# Altium PCB avr32da32_board_V2.PcbDoc
Units mil, origin at the board's own origin, x right, y up, seen from the top; angles counter-clockwise.
Board outline 1280 x 2865 mil, 2 copper layers (Top Layer, Bottom Layer); 34 components, 57 nets, 184 pads, 11 vias.
Unrouted connection lines stored in the file: 10.
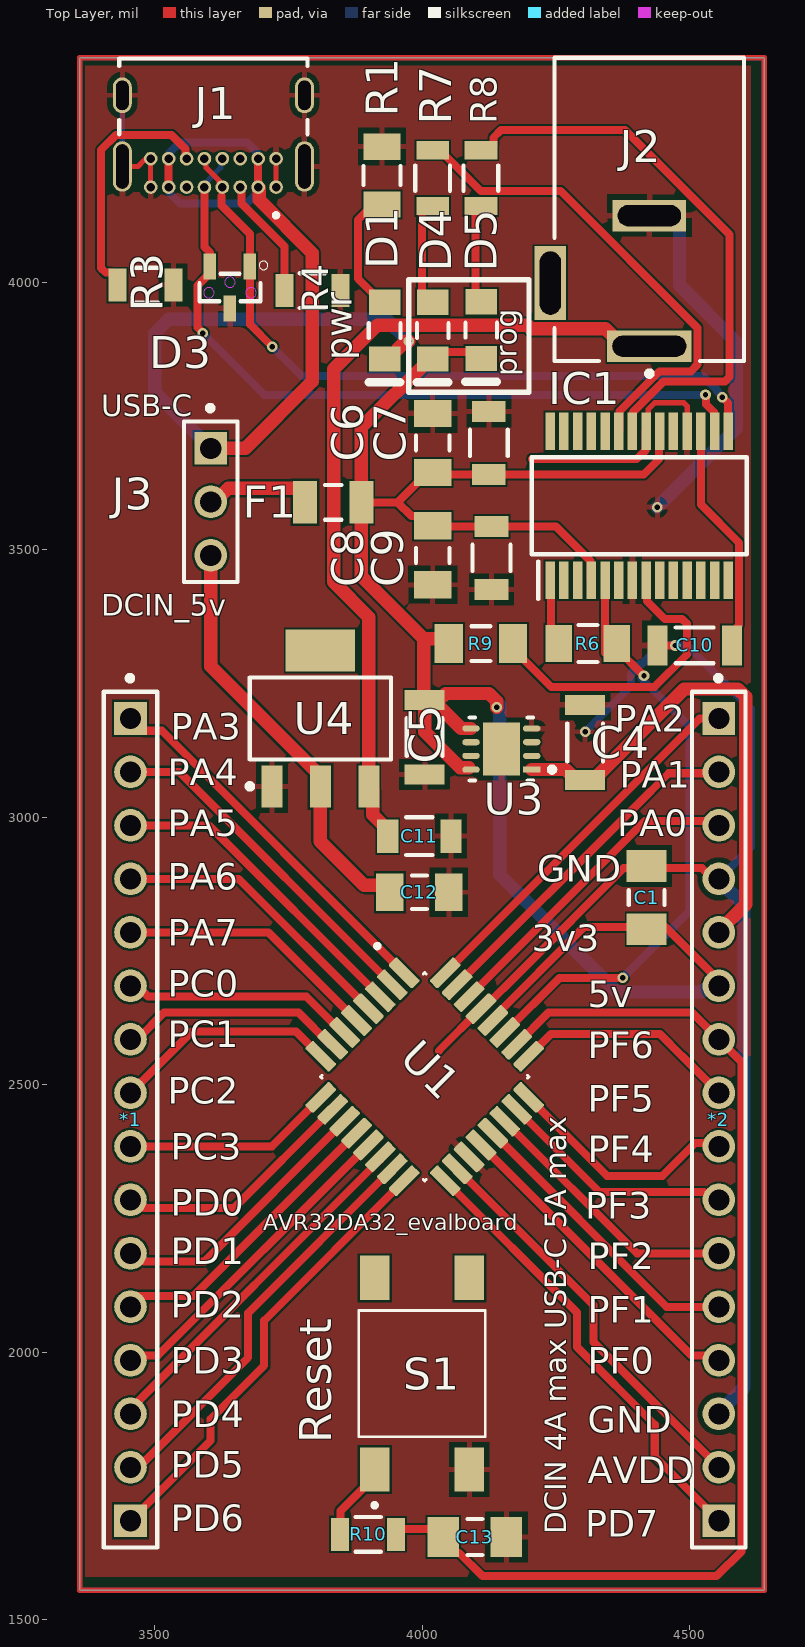
[diagram p0: Top Layer view]
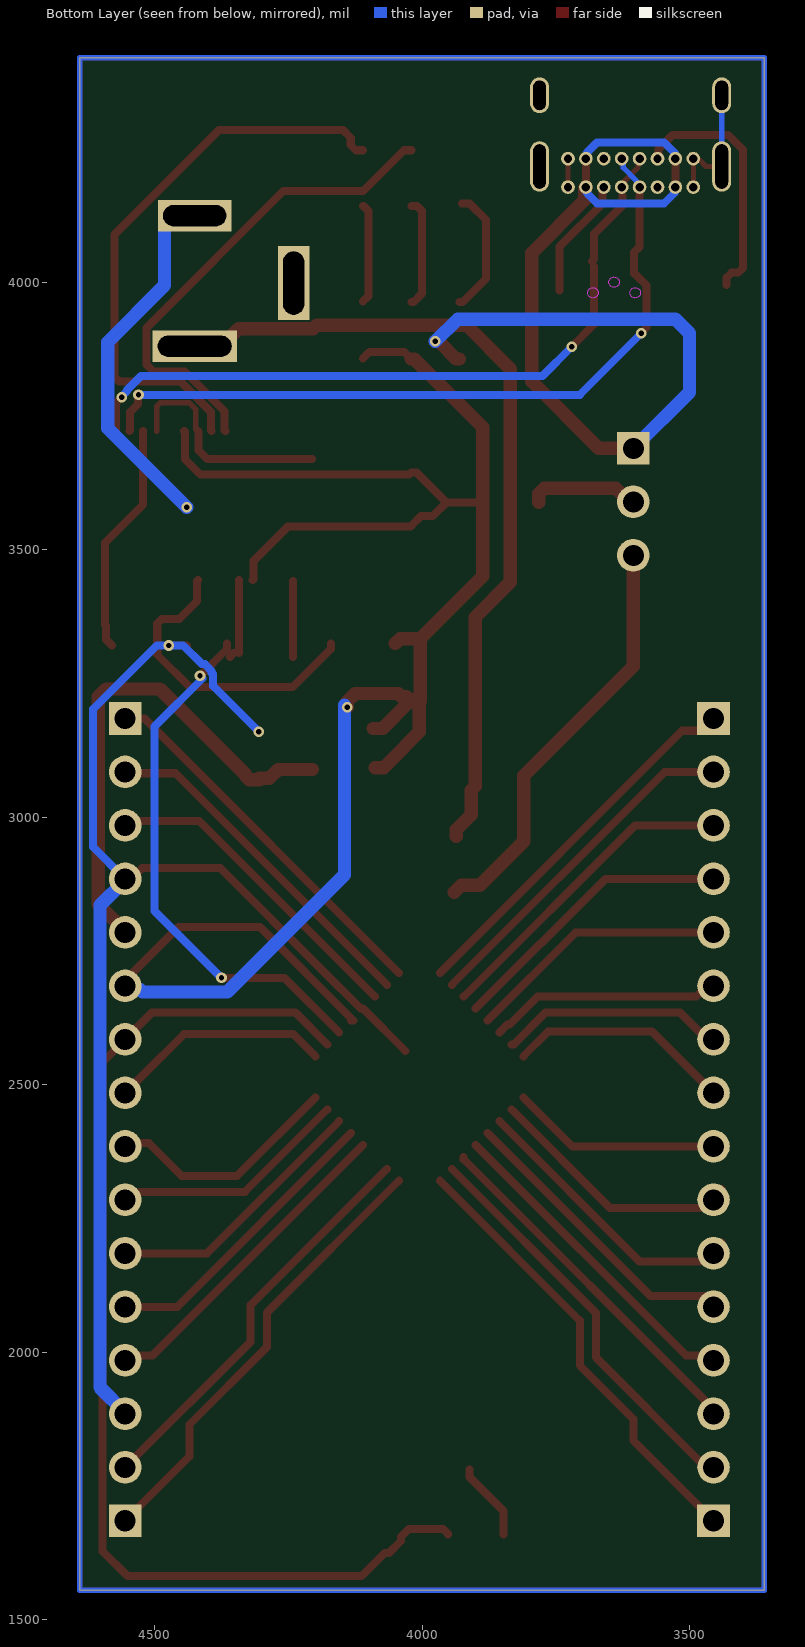
[diagram p1: Bottom Layer view, seen from below]

## Layer stack, top to bottom
Top Solder: solder mask 0.4, Solder Resist, Dk 3.5
Top Layer: signal copper 1.4
Dielectric 1: dielectric 12.6, FR-4, Dk 4.8
Bottom Layer: signal copper 1.4
Bottom Solder: solder mask 0.4, Solder Resist, Dk 3.5

## Board outline
3360,1555 3360,4420 4640,4420 4640,1555

## Design rules (kind name [scope] priority, off if disabled: settings)
Clearance [All] p1: gap=4 ignorepadtopadclearanceinfootprint=FALSE
PolygonConnect [All] p1: connectstyle=Relief reliefconductorwidth=10 reliefentries=4 polygonreliefangle="90 Angle" airgapwidth=10
RoutingVias [All] p1: holewidth=10 width=20 viastyle="Through Hole" minholewidth=10 minwidth=20 maxholewidth=10 maxwidth=20
SolderMaskExpansion [All] p1: expansion=4 istentingtop=FALSE
SupplyNets "Schematic Supply Nets_5" [InNet('VIN')] p1: voltage=0.000
SupplyNets "Schematic Supply Nets_4" [InNet('VBUS')] p2: voltage=0.000
SupplyNets "Schematic Supply Nets_3" [InNet('VCC')] p3: voltage=0.000
SupplyNets "Schematic Supply Nets_2" [InNet('+3v3')] p4: voltage=0.000
SupplyNets "Schematic Supply Nets_1" [InNet('GND')] p5: voltage=0.000
SupplyNets "Schematic Supply Nets" [InNet('+5')] p6: voltage=0.000
Width [All] p1: maxlimit=25 minlimit=10 preferedwidth=15
30 further rules are at their usual default settings.

## Components (designator, comment, footprint, x,y, rotation, side; value= is the part's Value field where it differs from the comment)
*1 "Custom Connector_16" "Custom Connector_16" 3455,2485 r270 top
*2 "Custom Connector_16" "Custom Connector_16" 4555,2485 r270 top
C1 "Capacitor 10 uF +/- 10% 16 V 1206" CAPC3216X180X50ML20T25 4420,2850 r270 top value=100nF
C4 "Capacitor 1 uF +/- 10% 25 V 1206" CAPC3216X180X20ML20 4305,3140.12 r270 top value=1µF
C5 "Capacitor 1 uF +/- 10% 25 V 1206" CAPC3216X180X20ML20 4005,3150 r90 top value=1µF
C6 "Capacitor 10 uF +/- 10% 16 V 1206" CAPC3216X180X50NL20T25 4020,3700 r90 top value=10µF
C7 "100nF" FP-1206-L_3_2_0_2-W_1_6_0-MFG 4125,3700 r90 top
C8 "Capacitor 10 uF +/- 10% 16 V 1206" CAPC3216X180X50NL20T25 4020,3490 r270 top value=10µF
C9 "100nF" FP-1206-L_3_2_0_2-W_1_6_0-MFG 4130,3485 r270 top
C10 "Capacitor 1 uF +/- 10% 25 V 1206" CAPC3216X180X20ML20 4509.73,3321.44 r180 top value=1µF
C11 "100nF" FP-1206-L_3_2_0_2-W_1_6_0-MFG 3995,2965 r0 top
C12 "Capacitor 10 uF +/- 10% 16 V 1206" CAPC3216X180X50NL20T25 3995.12,2860 r0 top value=10µF
C13 "Capacitor 10 uF +/- 10% 16 V 1206" CAPC3216X180X50ML20T25 4098.69,1654.66 r0 top
D1 "POWER_LED" LUMX-SML-LX1206IC_V 3930,3910 r270 top
D3 "CDSOT23-SM712" SOT95P230X117-3N 3640.82,3990.64 r270 top
D4 "SMLLX1206ICTR" LUMX-SML-LX1206IC_V 4020,3910 r270 top
D5 "SMLLX1206ICTR" LUMX-SML-LX1206IC_V 4110.68,3911.06 r270 top
F1 "0466001.NR" FP-0466-MFG 3833.98,3588.98 r0 top
IC1 "CY7C65213-28PVXI" SOP65P780X200-28N 4406.12,3582.69 r90 top
J1 "USB4085-GF-A_REVB" GCT_USB4085-GF-A_REVB 3610,4350 r180 top
J2 "PJ-002A" CUI-PJ-002A_V 4425,3999.02 r90 top
J3 "90120-0763" FP-90120-0763-MFG 3605,3590 r270 top
R1 "MCA1206MD1001BP100" FP-MCA1206-IPC_B 3925,4200 r270 top value=1k
R3 "CR1206-JW-151ELF" FP-CR1206-IPC_C 3482.76,3995 r0 top value=5.1k
R4 "CR1206-JW-151ELF" FP-CR1206-IPC_C 3795,3984.71 r0 top value=5.1k
R6 "MCA1206MD1001BP100" FP-MCA1206-IPC_B 4310,3325 r0 top value=1k
R7 "CR1206-JW-151ELF" FP-CR1206-IPC_C 4020,4195 r270 top value=150
R8 "CR1206-JW-151ELF" FP-CR1206-IPC_C 4110,4195 r270 top value=150
R9 "Resistor 10k +/-1% 1206 250 mW" RESC3216X60X45ML15T20 4110,3325 r180 top value=10k
R10 "CR1206-JW-151ELF" FP-CR1206-IPC_C 3899.25,1659.65 r180 top value=150
S1 "TS04-66-43-BK-100-SMT" SW_TS04-66-43-BK-100-SMT 4000,1960 r90 top
U1 "AVR32DA32-I/PT" QFP80P900X900X120-32N 4005,2515 r315 top
U3 "NCV8165ML330TCG" FP-507AD-IPC_B 4148.29,3127.8 r180 top
U4 "LD1117S50TR" STM-SOT-223_M 3810,3185 r90 top

## Footprints (in the part's own frame and the unit in brackets; to place one, negate y for a bottom-side part, rotate by r counter-clockwise, add the part's x,y. Pads: shape width x height; smd on the part's side, far side on the other; paste and mask are expansions set on the pad)
CAPC3216X180X20ML20 [mm] "Chip Capacitor, 2-Leads, Body 3.40x1.80mm, IPC Low Density"
  rect 0.95x1.9 smd: 1(-1.775,0) 2(1.775,0)
  silkscreen extent -0.9,-0.85 0.9,0.85, body extent -1.7,-0.9 1.7,0.9, height 1.8
CAPC3216X180X50ML20T25 [mm] "Chip Capacitor, 2-Leads, Body 3.40x1.80mm, IPC Low Density"
  rect 1.5x1.9 smd: 1(-1.5,0) 2(1.5,0)
  silkscreen extent -0.35,-0.85 0.35,0.85, body extent -1.7,-0.9 1.7,0.9, height 1.8
CAPC3216X180X50NL20T25 [mm] "Chip Capacitor, 2-Leads, Body 3.40x1.80mm, IPC Medium Density"
  rect 1.3x1.8 smd: 1(-1.4,0) 2(1.4,0)
  silkscreen extent -0.35,-0.8 0.35,0.8, body extent -1.7,-0.9 1.7,0.9, height 1.8
CUI-PJ-002A_V [mm] "THD, 3-Leads, Body 14.4x9mm, Height 11mm"
  rect 1.5x4 hole 1 slot 3.5 at 90 deg: 1(-3,0)
  rect 1.5x3.5 hole 1 slot 3 at 90 deg: 2(3.2,0)
  rect 3.5x1.5 hole 1 slot 3 at 0 deg: 3(0,4.7)
  silkscreen extent -4.42,-4.5 10.7,4.5, body extent -3.7,-4.5 10.7,4.9, height 11
"Custom Connector_16" [mm]
  rect 1.55x1.55 hole 1 paste-2539.97 mask+0: 1(-17.78,0) 16(20.32,0)
  round 1.55 hole 1 paste-2539.97 mask+0: 2(-15.24,0) 3(-12.7,0) 5(-7.62,0) 6(-5.08,0) 7(-2.54,0) 8(0,0) 9(2.54,0) 11(7.62,0) 12(10.16,0) 13(12.7,0) 14(15.24,0) 15(17.78,0)
  round 1.55 hole 1 paste-2539.97 mask-2539.97: 4(-10.16,0) 10(5.08,0)
  silkscreen extent -19.81,-1.27 21.59,1.27, body extent -19.15,-1.37 19.15,1.37, height 0.25
FP-0466-MFG [mil]
  rect 45x80 smd paste+0 mask+0: 1(-52.5,0) 2(52.5,0)
  silkscreen extent -15,-32 15,32, body extent -79,-44 79,44, height 10
FP-507AD-IPC_B [mm]
  rect 0.831x0.292 smd paste+0 mask+0: 1(-1.441,0.975)
  rrect100% 0.831x0.292 smd paste+0 mask+0: 2(-1.441,0.325) 3(-1.441,-0.325) 4(-1.441,-0.975) 5(1.441,-0.975) 6(1.441,-0.325) 7(1.441,0.325) 8(1.441,0.975)
  rect 1.75x2.5 smd paste-1000 mask+0: 9(0,0)
  silkscreen extent -2.53,-1.5 1.5,1.5, body extent -2.11,-1.75 2.11,1.75, height 0.25
FP-1206-L_3_2_0_2-W_1_6_0-MFG [mm]
  rect 1x1.6 smd paste+0 mask+0: 1(-1.5,0) 2(1.5,0)
  silkscreen extent -0.63,-0.9 0.63,0.9, body extent -2.1,-1 2.1,1, height 0.25
FP-90120-0763-MFG [mm]
  rect 1.55x1.55 hole 1 paste-2539.97 mask+0: 1(-2.54,0)
  round 1.55 hole 1 paste-2539.97 mask+0: 2(0,0) 3(2.54,0)
  silkscreen extent -4.57,-1.27 3.81,1.27, body extent -3.91,-1.37 3.91,1.37, height 0.25
FP-CR1206-IPC_C [mil]
  rect 33.79x61.5 smd paste+0 mask+0: 1(-52.24,0) 2(52.24,0)
  silkscreen extent -24,-32 24,32, body extent -73,-36 73,36, height 10
FP-MCA1206-IPC_B [mil]
  rect 49.44x69.22 smd paste+0 mask+0: 1(-54.18,0) 2(54.18,0)
  silkscreen extent -18,-35 18,35, body extent -89,-44 89,44, height 10
GCT_USB4085-GF-A_REVB [mm]
  round 0.65 hole 0.4: A1(-2.975,4.36) A4(-2.125,4.36) A5(-1.275,4.36) A6(-0.425,4.36) A7(0.425,4.36) A8(1.275,4.36) A9(2.125,4.36) A12(2.975,4.36) B1(2.975,3.01) B4(2.125,3.01) B5(1.275,3.01) B6(0.425,3.01) B7(-0.425,3.01) B8(-1.275,3.01) B9(-2.125,3.01) B12(-2.975,3.01)
  oval 0.9x1.7 hole 0.6 slot 1.4 at 90 deg: S1(-4.325,0) S2(4.325,0)
  oval 0.9x2.4 hole 0.6 slot 2.1 at 90 deg: S3(-4.325,3.38) S4(4.325,3.38)
  silkscreen extent -4.47,-1.74 4.47,5.8, body extent -4.47,-4.25 4.47,4.92, height 3.46
LUMX-SML-LX1206IC_V [mm] "SMD, 2-Leads, Body 3.2x1.5mm"
  rect 1.2x1.5 smd: 1(-1.35,0) 2(1.35,0)
  silkscreen extent -0.35,-0.75 2.45,0.75, body extent -1.6,-0.8 1.6,0.8, height 1.1
QFP80P900X900X120-32N [mm]
  rrect25% 1.6x0.55 smd: 1(-4.18,2.8) 2(-4.18,2) 3(-4.18,1.2) 4(-4.18,0.4) 5(-4.18,-0.4) 6(-4.18,-1.2) 7(-4.18,-2) 8(-4.18,-2.8) 17(4.18,-2.8) 18(4.18,-2) 19(4.18,-1.2) 20(4.18,-0.4) 21(4.18,0.4) 22(4.18,1.2) 23(4.18,2) 24(4.18,2.8)
  rrect25% 0.55x1.6 smd: 9(-2.8,-4.18) 10(-2,-4.18) 11(-1.2,-4.18) 12(-0.4,-4.18) 13(0.4,-4.18) 14(1.2,-4.18) 15(2,-4.18) 16(2.8,-4.18) 25(2.8,4.18) 26(2,4.18) 27(1.2,4.18) 28(0.4,4.18) 29(-0.4,4.18) 30(-1.2,4.18) 31(-2,4.18) 32(-2.8,4.18)
  silkscreen extent -6.08,-3.5 3.5,3.5, body extent -4.5,-4.5 4.5,4.5, height 1.2
RESC3216X60X45ML15T20 [mm] "Chip Resistor, 2-Leads, Body 3.3x1.75mm, IPC Low Density"
  rect 1.35x1.85 smd: 1(-1.525,0) 2(1.525,0)
  silkscreen extent -0.45,-0.82 0.45,0.82, body extent -1.65,-0.87 1.65,0.87, height 0.6
SOP65P780X200-28N [mm]
  rect 1.775x0.45 smd: 1(-3.538,4.225) 2(-3.538,3.575) 3(-3.538,2.925) 4(-3.538,2.275) 5(-3.538,1.625) 6(-3.538,0.975) 7(-3.538,0.325) 8(-3.538,-0.325) 9(-3.538,-0.975) 10(-3.538,-1.625) 11(-3.538,-2.275) 12(-3.538,-2.925) 13(-3.538,-3.575) 14(-3.538,-4.225) 15(3.538,-4.225) 16(3.538,-3.575) 17(3.538,-2.925) 18(3.538,-2.275) 19(3.538,-1.625) 20(3.538,-0.975) 21(3.538,-0.325) 22(3.538,0.325) 23(3.538,0.975) 24(3.538,1.625) 25(3.538,2.275) 26(3.538,2.925) 27(3.538,3.575) 28(3.538,4.225)
  silkscreen extent -4.43,-5.1 2.3,5.1, body extent -3.9,-5.1 3.9,5.1, height 2
SOT95P230X117-3N [mm]
  rect 1.25x0.6 smd paste-2: 1(-1,0.95) 2(-1,-0.95) 3(1,0)
  Keep-Out Layer circle w0: c0.25,1 r0.25
  Keep-Out Layer circle w0: c0.25,-1 r0.25
  Keep-Out Layer circle w0: c-0.25,0 r0.25
  silkscreen extent -1.26,-1.45 0.65,1.81, body extent -1.15,-1.45 1.15,1.45, height 1.17
STM-SOT-223_M [mm] "SOT223, 4-Leads, Body 6.7x3.7mm, Pitch 2.3mm, IPC Low Density"
  rect 2x1 smd: 1(-3.225,2.3) 2(-3.225,0) 3(-3.225,-2.3)
  rect 2x3.3 smd: 4(3.225,0)
  silkscreen extent -3.35,-3.35 1.95,3.47, body extent -3.5,-3.35 3.5,3.35, height 1.8
SW_TS04-66-43-BK-100-SMT [mm]
  rect 2.1x1.4 smd: 1(-4.55,2.25) 2(-4.55,-2.25) 3(4.55,2.25) 4(4.55,-2.25)
  silkscreen extent -6.35,-3 3,3, body extent -5,-3 5,3, height 4.3

## Part data
C1 C6 C8 C12: library part CMP-001-00016-6, "Chip Capacitor, 10 uF, +/- 10%, 16 V, 1206 (3216 Metric)", Capacitor Type=Ceramic, Case/Package=1206, Max Operating Temperature=125°C, Min Operating Temperature=-55°C, Tolerance=10%, Voltage Rating=16V, Mounting Technology=SM, Pins=2, RoHS Compliant=True
C4 C5 C10: library part CMP-001-00006-6, "Chip Capacitor, 1 uF, +/- 10%, 25 V, 1206 (3216 Metric)", Capacitor Type=Ceramic, Case/Package=1206, Max Operating Temperature=125°C, Min Operating Temperature=-55°C, Tolerance=10%, Voltage Rating=25V, Mounting Technology=SM, Pins=2, RoHS Compliant=True
C7 C9 C11: library part CMP-2000-05018-2, "General Purpose Ceramic Capacitor, 1206, 100nF, 10%, X7R, 15%, 50V", Case Code (Imperial)=1206, Case Code (Metric)=3216, Dielectric=X7R, Dielectric Material=Ceramic, Insulation Resistance=100GR, Max Operating Temperature=125°C, Min Operating Temperature=-55°C, Package Quantity=1, Tolerance=10%, Voltage=50V, Capacitance=100nF, Case/Package=1206, Construction=Flat, Contact Plating=Tin, Depth=1.6mm, Dissipation Factor=2.5%, Height=0.94mm, Lead Free="Lead Free", Length=3.2mm, Mount="Surface Mount", Number of Pins=2, Packaging="Tape and Reel", Radiation Hardening=No, REACH SVHC="No SVHC", RoHS Compliant=Yes, Series=-, Termination=SMD/SMT, Thickness=0.037inch, Voltage Rating=50V, Voltage Rating (DC)=50V, Width=1.6mm
C13: library part CMP-2000-05018-2, "General Purpose Ceramic Capacitor, 1206, 100nF, 10%, X7R, 15%, 50V", Capacitance=100nF, Case Code (Imperial)=1206, Case Code (Metric)=3216, Dielectric=X7R, Dielectric Material=Ceramic, Insulation Resistance=100GR, Max Operating Temperature=125°C, Min Operating Temperature=-55°C, Package Quantity=1, Tolerance=10%, Voltage=50V, Case/Package=1206, Construction=Flat, Contact Plating=Tin, Depth=1.6mm, Dissipation Factor=2.5%, Height=0.94mm, Lead Free="Lead Free", Length=3.2mm, Mount="Surface Mount", Number of Pins=2, Packaging="Tape and Reel", Radiation Hardening=No, REACH SVHC="No SVHC", RoHS Compliant=Yes, Series=-, Termination=SMD/SMT, Thickness=0.037inch, Voltage Rating=50V, Voltage Rating (DC)=50V, Width=1.6mm
D1 D4 D5: library part CMP-007-00044-1, "LED Uni-Color Red 635nm 2-Pin T/R"
D3: library part CMP-004-00031-2, "CDSOT23-SM712 Dual Bi-Directional TVS Diode 400W 3-Pin SOT-23", Case/Package="SOT-23 Bourns", Check_prices=https://www.snapeda.com/parts/CDSOT23-SM712/Bourns/view-part/?ref=eda, Component Type=Standard, Design Item ID=CDSOT23-SM712, MF=Bourns, MP=CDSOT23-SM712, Pins=3, SnapEDA_Link=https://www.snapeda.com/parts/CDSOT23-SM712/Bourns/view-part/?ref=snap, Source=CDSOT23-SM712.SchLib
F1: library part CMP-005-00014-1, "Electric Fuse, Very Fast Blow, 1A, 63VAC, 63VDC, 50A (IR), Surface Mount, 1206", Current Rating=1A, Max Operating Temperature=90°C, Min Operating Temperature=-55°C, Mounting Technology="Surface Mount", RoHS Compliant=Yes
IC1: "Integrated Circuit", Manufacturer_Name=Infineon, Mouser Part Number=727-CY7C65213-28PVXI, Arrow Part Number=CY7C65213-28PVXI, Arrow Price/Stock=https://www.arrow.com/en/products/cy7c65213-28pvxi/cypress-semiconductor?region=nac, Datasheet Link=http://www.mouser.com/datasheet/2/100/001-81011_CY7C65213_USB-UART_LP_Bridge_Controller_-348826.pdf, Height=2mm, Manufacturer_Part_Number=CY7C65213-28PVXI, Mouser Price/Stock=https://www.mouser.co.uk/ProductDetail/Infineon-Technologies/CY7C65213-28PVXI?qs=dOK1vf2izjvExqwVZ7qYig%3D%3D
J1: library part CMP-012-000000-1, "USB-C (USB TYPE-C) USB 2.0 æ’åº§è¿žæŽ¥å™¨ 24 (16+8 Dummy) ä½é€šå­”ã€ç›´è§’ã€ä½Žæˆæœ¬ã€3.46mm å¤–å½¢ã€16 é’ˆã€æ°´å¹³ã€é¡¶éƒ¨å®‰è£…", Package=None, Check_prices=https://www.snapeda.com/parts/USB4085-GF-A/Global+Connector+Technology/view-part/?ref=eda, Component Type=Standard, Design Item ID=USB4085-GF-A_REVB, MF="Global Connector Technology", MP=USB4085-GF-A, Pin Count=20, SnapEDA_Link=https://www.snapeda.com/parts/USB4085-GF-A/Global+Connector+Technology/view-part/?ref=snap, Source=USB4085-GF-A_REVB.SchLib
J2: library part CMP-002-00078-1, "12V, 1A, 2mm Dia", Voltage Rating=12V, Connector Type=Circular,Power, Mounting Technology=Board, RoHS Compliant=Yes
J3: library part CMP-002-00075-2, "Board Connector, 3 Contact(s), 1 Row(s), Male, Straight, 0.1 inch Pitch, Solder Terminal, Black Insulator, Receptacle", Max Operating Temperature=125°C, Min Operating Temperature=-55°C, Connector Type="BOARD CONNECTOR", Mounting Technology=Board, RoHS Compliant=Yes
R1 R6: library part CMP-009-00186-1, "Fixed Resistor, Thin Film, 0.25W, 1000ohm, 200V, 0.1% +/-Tol, 25ppm/Cel, Surface Mount, 1206", Case/Package=1206, Max Operating Temperature=155°C, Min Operating Temperature=-55°C, Power=400mW, Tolerance=0.1%, Pins=2, RoHS Compliant=Yes
R3 R4 R7 R8 R10: library part CMP-009-00182-1, "Fixed Resistor, Metal Glaze/thick Film, 0.25W, 150ohm, 200V, 5% +/-Tol, 200ppm/Cel, Surface Mount, 1206", Case/Package=1206, Max Operating Temperature=155°C, Min Operating Temperature=-55°C, Power=250mW, Tolerance=5%, Mounting Technology="Surface Mount", Pins=2, RoHS Compliant=Yes
R9: library part CMP-009-00016-5, "Chip Resistor, 10 KOhm, +/- 1%, 0.25 W, -55 to 155 degC, 1206 (3216 Metric)", Case/Package=1206, Max Operating Temperature=155°C, Min Operating Temperature=-55°C, Power=250mW, Tolerance=1%, Voltage Rating=200V, Mounting Technology=SM, Pins=2, RoHS Compliant=True
S1: library part CMP-014-000000-2, "Tactile Switches 6 x 6 mm, 4.3 mm Act Height, 100 gf, Black, Surface Mount, SPST,", Package=None, Availability=Unavailable, Component Type=Standard, Design Item ID=TS04-66-43-BK-100-SMT, MP=TS04-66-43-BK-100-SMT, Pin Count=4, Price=None, Source=TS04-66-43-BK-100-SMT.SchLib
U1: library part CMP-031-00006-3, "RISC Microcontroller, 8-Bit, FLASH, AVR CPU, 24MHz, CMOS, PQFP32", Case/Package=TQFP32, Max Supply Voltage=5.5V, Mfr_Name=Microchip, Min Supply Voltage=1.8V, ComponentLink1Description=https://www.digikey.ro/ro/products/detail/microchip-technology/AVR32DA32-I-PT/12396890, Design Item ID=AVR32DA32-IPT, Mounting Technology=SMD, RefDes=RefDes, RoHS Compliant=Yes, Source=AVR32DA32-IPT.SchLib, Type=Type
U3: library part CMP-012-00001-1, "Fixed Positive LDO Regulator, 3.3V, 0.29V Dropout, PDSO8"
U4: library part CMP-019-00006-3, "Fixed Low Drop Positive Voltage Regulator, 5 V, 0 to 125 degC, 4-Pin SOT223, RoHS, Tape and Reel", Case/Package=TO-261-4, Dropout Voltage=1.1V, Manufacturer=STMicroelectronics, Max Input Voltage=15V, Max Operating Temperature=125°C, Max Ouput Current=1.3A, Min Input Voltage=6.5V, Min Operating Temperature=0°C, Nominal Output Voltage=5V, Output Current=950mA, Package Description="4-Pin Small Outline Transistor, Body 6.5 x 3.5 mm, Pitch 2.3 mm", Package Quantity=2500, Package Reference=SOT-223, Power=12W, Datasheet URL=http://www.st.com/content/ccc/resource/technical/document/datasheet/99/3b/7d/91/91/51/4b/be/CD00000544.pdf/files/CD00000544.pdf/jcr:content/translations/en.CD00000544.pdf, Datasheet Version=Nov-13, Manufacturer URL=http://www.st.com/, Max Supply Voltage=15V, Min Supply Voltage=6.5V, Mounting Technology=SM, Output Voltage=5V, Outputs=1, Packaging=TapeandReel, Pins=4, RoHS Compliant=True

## Via types
v1: diameter 20, hole 10, Top Layer to Bottom Layer, 11 vias

## Nets (pads, with @x,y where several pads share a name; then routed paths per layer and width w, separated by ;. In a path a pad name is that pad's centre, name@x,y a point inside that pad or via, vN(x,y) a via of type N, cw(c..) or ccw(c..) an arc to the next point about the centre after c; other vN are vias at no path point)
+3v3: *2.5 C4.2 U3.1 | length 945.6
  Top Layer w25: U3.1 4269.17,3089.41 4285.56,3073.03 C4.2@4304.26,3073.03 ; C4.2@4304.26,3070.48 4322.96,3070.48 4329.16,3076.68 4329.16,3079.23 4489.93,3240 4590.36,3240 4605,3225.36 4605,2837.16 4555,2787.16 *2.5
+5: C12.1 J3.3 U4.2 | length 789.5
  Top Layer w25: J3.3 3605,3282.72 3810,3077.72 U4.2 3810,2955 3891.55,2873.45 3926.91,2873.45 3940,2860.36 C12.1
GND: *2.4 *2.14 C1.1 C4.1 C5.1 C6.2 C7.2 C8.2 C9.2 C10.2 C11.2 C12.2 C13.2 D3.3 IC1.7 IC1.18 IC1.21 J1.A1 J1.A12 J1.B1 J1.B12 J1.S1 J1.S2 J1.S3 J1.S4 J2.2 R1.1 R3.2 R4.2 S1.2 U1.19 U1.29 U3.4 U3.9 U4.1 | length 3387.1
  Top Layer w10: J1.S4 3469.04,4216.93 3480.63,4228.51 3489.89,4228.51 J1.B1@3492.46,4231.08 ; J1.A12@3492.46,4178.76 J1.B1@3492.46,4231.08 ; J1.B1 J1.B1@3492.46,4231.08 ; J1.A1 J1.B12 ; IC1.21 4422.77,3725.83 4422.77,3762.77 4435,3775 4489.83,3775 4495.69,3769.14 IC1.18
  Top Layer w15: 4031.36,2563.64 U1.29 ; 4205.33,3670 4401.41,3670 4417.56,3686.15 4417.56,3720.62 IC1.21 ; C10.2 v1(4473.5,3321.44)
  Bottom Layer w10: J1.S4 J1.S2
  Bottom Layer w15: v1(4305,3160) 4391,3246 4391,3267.87 4393.5,3270.37 4393.5,3273.91 4406.09,3286.5 4411.5,3286.5 4446.44,3321.44 v1(4473.5,3321.44) 4495.85,3321.44 4615,3202.29 4615,2945 *2.4
  Bottom Layer w25: J2.2 4464.37,4125 4481.4,4107.97 4481.4,3994.53 4587.78,3888.15 4587.78,3727.78 v1(4440,3580) ; *2.14 4555,1887.16 4602.01,1934.17 4602.01,2835.83 4555,2882.84 *2.4
GPIO5: IC1.8 R9.1 | length 579.3
  Top Layer w15: R9.1 4170.04,3315.16 4241.7,3243.5 4434.28,3243.5 4495,3304.22 4495,3362.39 4486.21,3371.18 4453.82,3371.18 4420.27,3404.73 4420.27,3442.04 IC1.8
Net*2_7: *2.7 C13.1 R10.1 U1.26 | length 1685.5
  Top Layer w15: R10.1 3951.5,1660.61 3960.89,1670 4024.29,1670 C13.1 4039.63,1646.79 4061.66,1624.76 4069.53,1624.76 4112.79,1581.5 4550.78,1581.5 4597.01,1627.74 4597.01,2314.18 4597.01,2542.99 *2.7
Net*2_15: *2.15 U1.18 | length 760.6
  Top Layer w15: U1.18 4320.68,2087.96 4320.68,2019.32 *2.15
NetC10_1: C10.1 IC1.17 | length 435.6
  Top Layer w15: IC1.17 4521.28,3584.88 4592.82,3513.34 4592.82,3360.13 4590.82,3358.13 4590.82,3332.64 C10.1
NetD1_1: D1.1 R1.2 | length 235.5
  Top Layer w15: R1.2@3925,4147.76 3911.14,4147.76 3880,4116.61 3880,4007.24 3924.09,3963.15 D1.1
NetD2_1: 
NetD3_1: D3.1 IC1.15 J1.A6 J1.B6 | length 1267.3
  Top Layer w15: 3625,4161.85 3625,4143.95 3678.22,4090.74 3678.22,4043.63 D3.1@3682.53,4039.32 ; J1.A6 J1.A6@3628.76,4176.32 ; D3.1 3678.22,3921.78 v1(3720,3880) ; v1(4561.28,3785.68) 4561.36,3785.68 4572.46,3774.58 IC1.15
  Bottom Layer w15: v1(3720,3880) 3775,3825 4525.41,3825 4551.5,3798.91 4551.5,3796.81 4561.28,3787.03 v1(4561.28,3785.68)
NetD3_2: D3.2 IC1.16 J1.A7 J1.B7 | length 1354.2
  Top Layer w15: v1(3590,3905) 3590,3906.29 3580,3916.29 3580,3994.12 3598.79,4012.91 3599.11,4012.91 3603.42,4017.22 3603.42,4043.63 3603.42,4056.42 3593.27,4066.57 J1.A7 ; v1(4530,3790) 4530.96,3789.04 4530.96,3772.36 4545.51,3757.81 4545.51,3723.33 IC1.16
  Bottom Layer w15: v1(3590,3905) 3705,3790 v1(4530,3790)
NetD4_1: D4.1 R7.2 | length 204.7
  Top Layer w15: D4.1 4016.12,3963.15 4000,3979.27 4000,4133.36 4009.39,4142.76 R7.2
NetD5_1: D5.1 R8.2 | length 187.5
  Top Layer w15: R8.2 4109.39,4142.76 4100,4133.36 4100,3974.89 D5.1
NetF1_1: F1.1 J3.2 | length 207
  Top Layer w25: J3.2 3612.66,3590 3637.66,3615 3771.48,3615 3781.48,3605 F1.1
NetIC1_1: IC1.1 R6.1 | length 142.4
  Top Layer w15: R6.1@4240.82,3300 IC1.1@4240.82,3442.36
NetJ1_A5: J1.A5 R4.1 | length 227.8
  Top Layer w15: J1.A5 3662.22,4176.32 3662.22,4147.78 3742.76,4067.24 R4.1
NetJ1_B5: J1.B5 R3.1 | length 472
  Top Layer w15: R3.1 3430.51,4008.86 3421.12,4018.25 3408.79,4018.25 3400,4027.04 3400,4248.05 3427.62,4275.67 3531.85,4275.67 3557.78,4249.75 3557.78,4233.52 J1.B5
NetR2_1: 
NetR10_2: R10.2 S1.1 | length 147.6
  Top Layer w15: R10.2@3847.76,1659.65 3847.76,1703.43 3911.42,1767.09 S1.1
NetU2_2: 
NetU2_3: 
NetU2_6: 
NetU2_7: 
NetU2_8: 
PA0: *2.3 U1.30
PA1: *2.2 U1.31
PA2: *2.1 U1.32 | length 708.6
  Top Layer w15: U1.32 4519.1,3185 *2.1
PA3: *1.1 U1.1 | length 708.6
  Top Layer w15: *1.1 3478.01,3161.99 3513.91,3161.99 U1.1
PA4: *1.2 U1.2 | length 654.2
  Top Layer w15: *1.2 3546.36,3085 U1.2
PA5: *1.3 U1.3 | length 599.7
  Top Layer w15: *1.3 3601.81,2985 U1.3
PA05: IC1.5 R6.2 U1.27 | length 1139.3
  Top Layer w15: U1.27 4256.81,2700 v1(4375,2700) ; R6.2@4342.14,3307.04 IC1.5 ; R6.2@4352.14,3307.04 R6.2@4359.18,3300 ; R6.2 4364.18,3315.11 4414.29,3265 v1(4415,3265)
  Bottom Layer w15: v1(4375,2700) 4500,2825 4500,3170 v1@4410,3260
PA6: *1.4 U1.4 | length 545.2
  Top Layer w15: *1.4 3657.27,2885 U1.4
PA7: *1.5 U1.5 | length 490.7
  Top Layer w15: *1.5 3712.73,2785 U1.5
PA14: 
PC0: *1.6 U1.6 | length 437.6
  Top Layer w15: *1.6 3467.43,2685 3487.43,2665 3783.7,2665 3836.02,2612.69 3840.5,2612.69 U1.6 ; *1.6@3460.63,2704.41 *1.6@3461.96,2704.41
PC1: *1.7 U1.7 | length 423.2
  Top Layer w15: *1.7 3467.45,2585 3517.45,2635 3769.16,2635 3828.47,2575.69 U1.7
PC2: *1.8 U1.8 | length 422.6
  Top Layer w15: *1.8 3570,2600 3764.1,2600 U1.8
PC3: *1.9 U1.9 | length 398.6
  Top Layer w5: *1.9@3440,2405 *1.9@3444.97,2405
  Top Layer w15: *1.9 3719.1,2385 U1.9
PD0: *1.10 U1.10 | length 483.8
  Top Layer w15: *1.10@3440,2305 3444.97,2305 3479.97,2270 3648.64,2270 U1.10
PD1: *1.11 U1.11 | length 538.3
  Top Layer w15: *1.11@3440,2205 3444.97,2205 3479.97,2170 3593.19,2170 U1.11
PD2: *1.12 U1.12 | length 570
  Top Layer w15: *1.12@3440,2090 3452.45,2090 3467.45,2105 3572.73,2105 U1.12
PD3: *1.13 U1.13 | length 611.5
  Top Layer w15: *1.13 3463.81,1993.81 3506.08,1993.81 U1.13
PD4: *1.14 U1.14 | length 704.2
  Top Layer w15: *1.14@3440,1890 3447.55,1890 *1.14@3463.81,1906.26 ; *1.14 3455,1893.7 3922.04,2360.74 U1.14
PD5: *1.15 U1.15 | length 782.4
  Top Layer w15: *1.15@3440,1790 3444.99,1794.98 3479.99,1794.98 3675,1990 3675,2073.64 U1.15
PD6: *1.16 U1.16 | length 847.6
  Top Layer w15: *1.16 3605,1835 3605,1875 3705,1975 3705,2059.1 U1.16
PD7: *2.16 U1.17 | length 847.6
  Top Layer w15: U1.17 4290,2074.1 4290,2009.69 4435.08,1864.61 4435.08,1804.92 *2.16
PF0: *2.13 U1.20 | length 611.5
  Top Layer w15: U1.20 4503.92,1993.81 4546.19,1993.81 *2.13
PF1: *2.12 U1.21 | length 557
  Top Layer w15: U1.21 4457.27,2085 *2.12
PF2: *2.11 U1.22 | length 502.6
  Top Layer w15: U1.22 4401.81,2185 *2.11
PF3: *2.10 U1.23 | length 448.1
  Top Layer w15: U1.23 4331.36,2300 4527.55,2300 4542.55,2285 *2.10
PF4: *2.9 U1.24 | length 444.3
  Top Layer w15: U1.24 4345.9,2330 4449.58,2330 4510.77,2391.19 4548.81,2391.19 *2.9
PF5: *2.8 U1.25 | length 418.5
  Top Layer w15: U1.25 4240.9,2595 4444.64,2595 4484.63,2555.02 4484.98,2555.02 *2.8
RXLED: IC1.22 R8.1 | length 1079.7
  Top Layer w15: R8.1 4123.86,4247.24 4133.25,4256.64 4133.25,4270.49 4147.76,4285 4379.69,4285 4575,4089.69 4575,3823.79 4566.21,3815 4451.67,3815 4394.68,3758.02 4394.68,3723.33 IC1.22
TXLED: IC1.23 R7.1 | length 921.6
  Top Layer w15: R7.1 4033.86,4247.24 4109.95,4171.15 4259.29,4171.15 4515.24,3915.2 4515.24,3846.61 4502.63,3834 4443.8,3834 4369.09,3759.3 4369.09,3723.33 IC1.23
VBUS: D1.2 J1.A4 J1.A9 J1.B4 J1.B9 J3.1 | length 1983.7
  Top Layer w15: J1.A9 J1.B4 ; J1.B9@3691.64,4233.52 J1.B9 J1.A4
  Top Layer w25: J3.1 3670,3690 3795,3815 3795,4055 3695.49,4154.51 3695.49,4176.36 3693.66,4178.19 J1.A4 ; D1.2 3935.91,3856.85 3969.06,3890 v1(3975,3890)
  Bottom Layer w15: J1.A9 3528.36,4176.32 3528.36,4166.94 3547.25,4148.05 3672.75,4148.05 3691.64,4166.94 3691.64,4176.32 J1.A4 ; J1.B4 3528.36,4233.52 3528.36,4242.9 3547.25,4261.79 3672.75,4261.79 3691.64,4242.9 3691.64,4233.52 J1.B9
  Bottom Layer w25: J3.1 3500,3795 3500,3905.36 3526.14,3931.5 3933.5,3931.5 v1(3975,3890)
VCC: *2.6 C1.2 C5.2 C6.1 C7.1 C8.1 C9.1 D4.2 D5.2 F1.2 IC1.4 IC1.20 R9.2 U1.28 U3.5 U3.8 | length 3224.5
  Top Layer w15: F1.2 3954.26,3588.98 ; D4.2 4033.15,3870 4098.59,3870 D5.2 ; IC1.4 4315.2,3444.75 4315.2,3479.22 4250.36,3544.06 C9.1 4021.06,3544.06 C8.1 4001.91,3563.21 3980.03,3563.21 3954.26,3588.98 ; IC1.20 4443.15,3720.62 4443.15,3669.56 4414.53,3640.94 C7.1 4023.94,3640.94 C6.1 4010.16,3644.88 3954.26,3588.98
  Top Layer w25: C5.2@4003.29,3217.68 4003.29,3334.28 ; C5.2 4023.16,3219.88 4029.36,3226.08 4039.12,3226.08 4044.55,3231.51 4125.32,3231.51 4139.97,3216.86 v1(4139.97,3206.15) ; C5.2@4005,3224.88 4005,3159.94 4058.71,3106.23 4058.71,3105.78 4071.75,3092.74 U3.8@4087.71,3092.74 ; D4.2 4014.09,3856.85 3886.48,3729.23 F1.2 3886.48,3451.09 4003.29,3334.28 ; C5.2@4028.19,3211.48 4073.48,3166.18 U3.5 ; R9.2 4040.68,3334.28 4003.29,3334.28
  Bottom Layer w25: v1@4145,3210 4145,2892.52 4364.02,2673.5 4522.34,2673.5 4526.95,2678.11 4548.11,2678.11 *2.6
VIN: C11.1 J2.1 U4.3 | length 1555.2
  Top Layer w25: C11.1 3935.94,2976.81 3907.74,3005.02 3907.74,3050.85 U4.3 3900.55,3374.45 3835,3440 3835,3838.33 3916.67,3920 4197.22,3920 4203.6,3913.62 4343.07,3913.62 4375.79,3880.91 J2.1
pads on no net: IC1.2 IC1.3 IC1.6 IC1.9 IC1.10 IC1.11 IC1.12 IC1.13 IC1.14 IC1.19 IC1.24 IC1.25 IC1.26 IC1.27 IC1.28 J1.A8 J1.B8 J2.3 S1.3 S1.4 U3.2 U3.3 U3.6 U3.7 U4.4
copper on no net: | length 2964.5
  Top Layer w10: 3593.27,4231.5 3596.25,4228.51 3596.25,4214.67 3621.06,4189.86 3621.06,4188.23 3626.73,4182.57 3626.73,4178.35
  Top Layer w15: 3455,2985 3455,2997.45 ; 3557.78,4176.32 3559.8,4178.35 ; 3557.78,4233.52 3559.8,4231.5 ; 4065.69,2687.04 4397.01,3018.36 4461.16,3082.51 4512.52,3082.51 4552.52,3082.51 4555,3085 ; 4087.96,2664.77 4416.55,2993.36 4546.64,2993.36 4555,2985 ; 4115.1,2643.2 4185,2713.1 4376.9,2905 4435.94,2905 4523.2,2905 4543.2,2885 4555,2885 ; 4128.02,2620.23 4132.5,2620.23 4132.5,2624.41 4303.1,2795 4455,2795 4555,2695 4555,2685 ; 4177.04,2575.69 4236.36,2635 4505,2635 4555,2585 ; 4546.19,1893.81 4555,1885 ; 4550.77,3180.78 4555,3185
  Bottom Layer w10: 3593.27,4178.35 3593.27,4182.57 3598.94,4188.23 3598.94,4189.86 3623.75,4214.67 3623.75,4228.51 3626.73,4231.5

## Polygon pours and split planes (outlines as drawn)
GND on Top Layer "NONET_L-01_P-001" (solid, pour order 0): 3370,4405 4615,4405 4615,1580 3370,1580

## Other copper
Multi-Layer:
  the board outline again, w10

## Silkscreen, mask and mechanical layers (free items; w line width, h text height)
Top Overlay:
  lines w10: 3975,3795 3975,3800 3975,4005 4200,4005 4200,3795 4185,3795 3975,3795
  text "pwr" at 3868.34,3855 h50 r90
  text "prog" at 4176.67,3825 h40 r90
  text "USB-C" at 3400,3750 h40
  text "DCIN_5v" at 3400,3376.66 h40
  text "PA2" at 4360,3160 h50
  text "PA3" at 3530,3145 h50
  text "PA4" at 3525,3060 h50
  text "PA1" at 4370,3055 h50
  text "PA5" at 3525,2965 h50
  text "PA0" at 4365,2965 h50
  text "GND" at 4215,2880 h50
  text "PA6" at 3525,2865 h50
  text "PA7" at 3525,2760 h50
  text "3v3" at 4205,2750 h50
  text "PC0" at 3525,2665 h50
  text "5v" at 4310,2645 h50
  text "PC1" at 3525,2570 h50
  text "PF6" at 4310,2550 h50
  text "PC2" at 3525,2465 h50
  text "PF5" at 4310,2450 h50
  text "PC3" at 3530,2360 h50
  text "PF4" at 4310,2355 h50
  text "PD0" at 3530,2255 h50
  text "PF3" at 4305,2250 h50
  text "AVR32DA32_evalboard" at 3703,2228 h30
  text "PD1" at 3530,2165 h50
  text "PF2" at 4310,2155 h50
  text "PD2" at 3530,2065 h50
  text "PF1" at 4310,2055 h50
  text "PD3" at 3530,1960 h50
  text "PF0" at 4310,1960 h50
  text "PD4" at 3530,1860 h50
  text "GND" at 4310,1850 h50
  text "Reset" at 3830,1830 h60 r90
  text "PD5" at 3530,1765 h50
  text "AVDD" at 4310,1755 h50
  text "PD6" at 3530,1665 h50
  text "DCIN 4A max USB-C 5A max" at 4270,1660 h40 r90
  text "PD7" at 4305,1655 h50

## Text inside footprints (layer, text, board x,y; h text height)
J1: Mechanical 13 "PCB EDGE" at 3195,4445 h32 r180